# Altium PCB da12_v100.PcbDoc (part 2 of 5)
Units mil, origin at the board's own origin, x right, y up, seen from the top; angles counter-clockwise.
Board outline 4646.03 x 3622.4 mil, 4 copper layers (Top Layer, GND, POWER, Bottom Layer), stack 23.756 mil thick; 376 components, 191 nets, 1000 pads, 352 vias.
Unrouted connection lines stored in the file: 152.
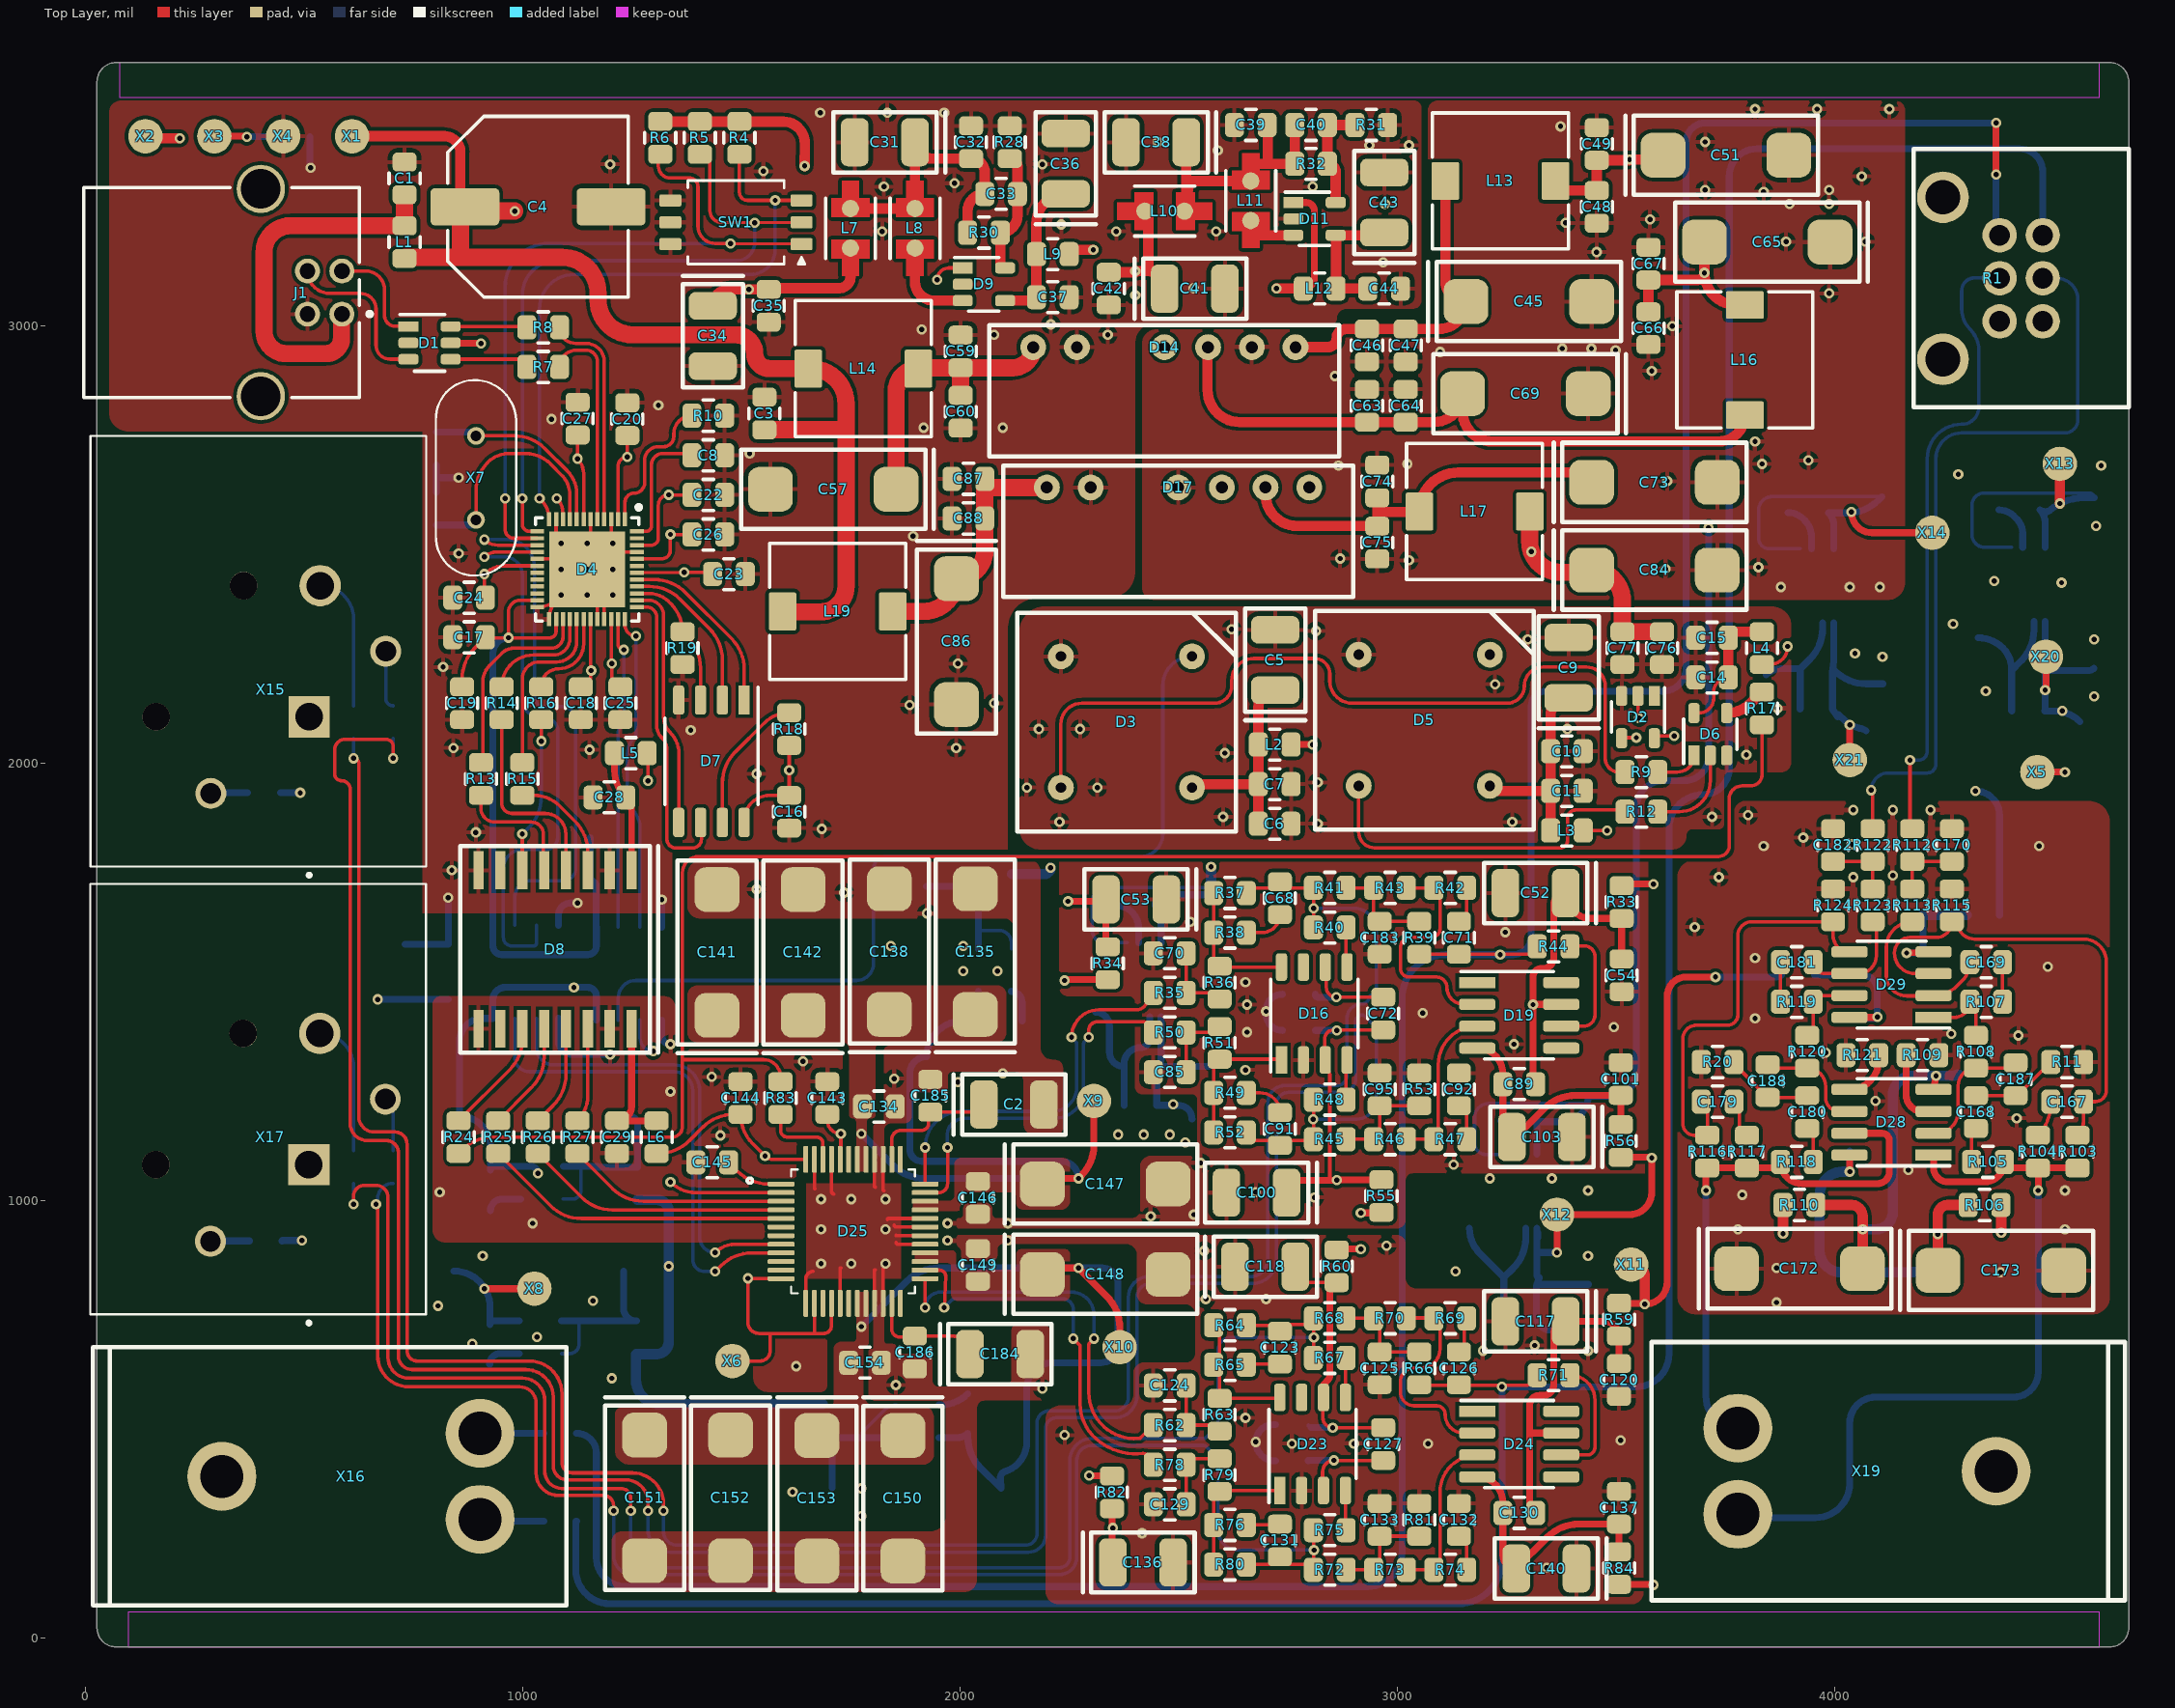
[diagram p0: Top Layer view]

## Part data (continued)
C30: "Ceramic capacitor 1206 X7R 22µF 10V", Capacitance=22uF, Case Code (Imperial)=1206, Case Code (Metric)=3216, Dielectric=X7R, Manufacturer 1=Murata, Max Operating Temperature=125°C, Min Operating Temperature=-55°C, Package Quantity=1, Tolerance=10%, Voltage=10V, Case/Package=1206, Category="Ceramic Capacitors", ComponentLink1Description=https://datasheet.ciiva.com/6072/1747483-6072695.pdf?src-supplier=Farnell, ComponentLink1URL=https://datasheet.ciiva.com/6072/1747483-6072695.pdf?src-supplier=Farnell, ComponentLink2Description=https://datasheet.ciiva.com/11787/0900766b80ef921d-11787760.pdf?src-supplier=RSComponents, ComponentLink2URL=https://datasheet.ciiva.com/11787/0900766b80ef921d-11787760.pdf?src-supplier=RSComponents, ComponentLink3Description=https://datasheet.ciiva.com/3777/1492grm31cr71a226ke1523-3777120.pdf?src-supplier=Arrow+Electronics, ComponentLink3URL=https://datasheet.ciiva.com/3777/1492grm31cr71a226ke1523-3777120.pdf?src-supplier=Arrow+Electronics, ComponentLink4Description=https://datasheet.ciiva.com/29202/451120-da-01-de-vs-chip-kond-1206-22-0-uf-10pr-10-0v-x7r-29202604.pdf?src-supplier=Conrad, ComponentLink4URL=https://datasheet.ciiva.com/29202/451120-da-01-de-vs-chip-kond-1206-22-0-uf-10pr-10-0v-x7r-29202604.pdf?src-supplier=Conrad, ComponentLink5Description=https://datasheet.ciiva.com/29202/451412-da-01-de-vs-kondens-grm31-cr71a-226ke15l-29202268.pdf?src-supplier=Conrad, ComponentLink5URL=https://datasheet.ciiva.com/29202/451412-da-01-de-vs-kondens-grm31-cr71a-226ke15l-29202268.pdf?src-supplier=Conrad, ComponentLink6Description=https://datasheet.ciiva.com/14116/grmseries-highdielectrictype-eng-14116398.pdf?src-supplier=Distrelec, ComponentLink6URL=https://datasheet.ciiva.com/14116/grmseries-highdielectrictype-eng-14116398.pdf?src-supplier=Distrelec, ComponentLink7Description=https://datasheet.ciiva.com/7937/1747483-7937735.pdf?src-supplier=Element14, ComponentLink7URL=https://datasheet.ciiva.com/7937/1747483-7937735.pdf?src-supplier=Element14, ComponentLink8Description=https://datasheet.ciiva.com/142/partnumbering-e-01-142120.pdf?src-supplier=Digi-Key, ComponentLink8URL=https://datasheet.ciiva.com/142/partnumbering-e-01-142120.pdf?src-supplier=Digi-Key, ComponentLink9Description=https://datasheet.ciiva.com/142/partnumbering-e-01-142119.pdf?src-supplier=Digi-Key, ComponentLink9URL=https://datasheet.ciiva.com/142/partnumbering-e-01-142119.pdf?src-supplier=Digi-Key, ComponentLink10Description=https://datasheet.ciiva.com/142/partnumbering-e-01-142121.pdf?src-supplier=Digi-Key, ComponentLink10URL=https://datasheet.ciiva.com/142/partnumbering-e-01-142121.pdf?src-supplier=Digi-Key, ComponentLink11Description=https://datasheet.ciiva.com/48671/product-48671339.pdf?src-supplier=Avnet, ComponentLink11URL=https://datasheet.ciiva.com/48671/product-48671339.pdf?src-supplier=Avnet, ComponentLink12Description=https://datasheet.ciiva.com/16440/product-16440671.pdf?src-supplier=Future+Electronics, ComponentLink12URL=https://datasheet.ciiva.com/16440/product-16440671.pdf?src-supplier=Future+Electronics, ComponentLink13Description=https://datasheet.ciiva.com/2989/product-2989773.pdf?src-supplier=Avnet, ComponentLink13URL=https://datasheet.ciiva.com/2989/product-2989773.pdf?src-supplier=Avnet, Construction=Flat, Depth=1.6mm, Height=1.6mm, Lead Free="Lead Free", Length=3.2mm, Manufacturer Part Number 1=GRM31CR71A226KE15L, Material=Ceramic, Mount=SMT, Packaging="Tape and Reel", Pricing 1="1=0,81930, 10=0,51230, 25=0,48340, 100=0,42480, 250=0,42420, 500=0,35180, 1000=0,34810, 3000=0,30810, 6000=0,24770, 15000=0,23430 (USD)", Radiation Hardening=No, REACH SVHC="No SVHC", RoHS=Yes, RoHS Compliant=Yes, Series=GRM, Stock 1=16303, Supplier 1="Arrow Electronics", Supplier Part Number 1=GRM31CR71A226KE15L, Termination=SMD/SMT, Thickness=0.071inch, Type=Конденсатор, Voltage Rating=10V, Voltage Rating (DC)=10V, Width=0.063inch
C33 C40: "Ceramic capacitor 0805 X7R 100pF 50V", Capacitance=1nF, Case Code (Imperial)=0805, Case Code (Metric)=2012, Dielectric=X7R, Manufacturer 2=Yageo, Manufacturer Part Number 2=CC0805MRX7R9BB102, Max Operating Temperature=125°C, Min Operating Temperature=-55°C, Resistor Type=Ceramic, Supplier Part Number 1=311-4349-1-ND, Tolerance=20%, Voltage=50V, Case/Package=0805, Category="Ceramic Capacitors", ComponentLink1Description=http://www.mouser.com/ds/2/447/Yageo_UPY-GP_NP0_16V-to-50V_9-358835.pdf?src-supplier=Mouser, ComponentLink1URL=http://www.mouser.com/ds/2/447/Yageo_UPY-GP_NP0_16V-to-50V_9-358835.pdf?src-supplier=Mouser, ComponentLink2Description=http://components.arrow.com/part/dataview/0323_04166629?src-supplier=Arrow+Europe, ComponentLink2URL=http://components.arrow.com/part/dataview/0323_04166629?src-supplier=Arrow+Europe, ComponentLink3Description=http://www.yageo.com/documents/recent/UPY-GPHC_X7R_6.3V-to-50V_18.pdf?src-supplier=Digi-Key, ComponentLink3URL=http://www.yageo.com/documents/recent/UPY-GPHC_X7R_6.3V-to-50V_18.pdf?src-supplier=Digi-Key, Depth=1.25mm, Halogen Free="Halogen Free", Lead Free="Lead Free", Length=0.079inch, Mount=SMT, Packaging="Tape and Reel", Pricing 2="1=0,14000, 10=0,08800, 50=0,08800, 100=0,03900, 1000=0,02500, 10000=0,02100 (USD)", RoHS=Yes, RoHS Compliant=Yes, Series=CC, Stock 2=5617, Supplier 1=Digi-Key, Supplier 2=Mouser, Supplier Part Number 2=603-CC805MRX7R9BB102, Thickness=0.028inch, Type=Конденсатор, Voltage Rating=50V, Voltage Rating (DC)=50V, Width=0.049inch
C45 C51 C57 C65 C69 C73 C84 C86 C135 C138 C141 C142 C147 C148 C150 C151 C152 C153 C172 C173: library part TANT_D, "Описание свойств компонента"
C145: "Ceramic capacitor 0805 X7R 1uF 50V", Capacitance=1uF, Case Code (Imperial)=0805, Case Code (Metric)=2012, Dielectric=X7R, Manufacturer 2=Yageo, Max Operating Temperature=125°C, Min Operating Temperature=-55°C, Resistor Type=Ceramic, Supplier Part Number 1=311-4349-1-ND, Tolerance=10%, Voltage=50V, Case/Package=0805, Category="Ceramic Capacitors", ComponentLink1Description=https://datasheet.ciiva.com/13209/upy-gphc-x7r-6-3v-to-50v-8-12304-13209375.pdf?src-supplier=Mouser, ComponentLink1URL=https://datasheet.ciiva.com/13209/upy-gphc-x7r-6-3v-to-50v-8-12304-13209375.pdf?src-supplier=Mouser, Construction=Flat, Depth=1.25mm, Halogen Free="Halogen Free", Height=1.25mm, Lead Free="Lead Free", Length=2mm, Manufacturer Part Number 2=CC0805KKX7R9BB105, Mount=SMT, Packaging="Tape and Reel", Pricing 2="1=0,26000, 10=0,17900, 50=0,11920, 100=0,10130, 500=0,07152, 1000=0,06257 (USD)", Radiation Hardening=No, RoHS=Yes, RoHS Compliant=Yes, Series=CC, Stock 2=48794, Supplier 1=Digi-Key, Supplier 2=Digi-Key, Supplier Part Number 2=311-1886-1-ND, Termination=SMD/SMT, Thickness=0.057inch, Type=Конденсатор, Voltage Rating=50V, Voltage Rating (DC)=50V, Weight=0.000194oz, Width=0.049inch
D1: "Very low capacitance ESD protection", Case/Package=SOT-23-6, Supplier Part Number 1=7131158, Mount=SMT, Supplier 1="Future Electronics", Type=Микросхема
D2: "Single Schmitt-Trigger Inverter", Case/Package=SOT-23-5, Supplier Part Number 1=296-11607-1-ND, Mount=SMT, Supplier 1=Digi-Key, Type=Микросхема
D3 D5: library part OSC_4PIN_DIL, "Описание свойств компонента"
D4: library part CT7601, "Описание свойств компонента"
D6: library part 1G32, "Описание свойств компонента"
D7: "3V 32M-BIT SERIAL FLASH MEMORY WITH DUAL, QUAD SPI", Case/Package=SOIC-8-208, Supplier Part Number 1=W25Q32JVSSIQCT-ND, Mount=SMT, Supplier 1=Digi-Key, Supplier 2=Digi-Key, Supplier 3=RSComponents, Supplier 4="Arrow Electronics", Supplier 5=RSComponents, Supplier Part Number 2=W25Q32JVSSIQ-ND, Supplier Part Number 3=1882528, Supplier Part Number 4="W25Q32JVSSIM TR", Supplier Part Number 5=1712228, Type=Микросхема
D8: library part ADUM140X, "Описание свойств компонента"
D9 D11: library part SY8088, "Описание свойств компонента"
D10 D12: library part ADUM1250, "Описание свойств компонента"
D13 D15 D18 D21: library part LP2985, "Описание свойств компонента"
D14: library part AM3D-0509DH30Z, "Описание свойств компонента"
D16 D23: library part OPA1632_SOIC, "Описание свойств компонента"
D17: library part AM3D-0509SZ, "Описание свойств компонента"
D19 D24: library part TL061, "Описание свойств компонента"
D20 D22 D26 D27: library part TPS7A4901/3001, "Описание свойств компонента"
D25: library part AK4490_TQFP, "Описание свойств компонента"
D28 D29: "Dual standard, industrial-grade, operational amplifier 8-SOIC -25 to 85", Case/Package=SOIC-8-150, Dual Supply Voltage=9V, Input Bias Current=200pA, Input Offset Voltage (Vos)=3mV, Manufacturer 1="Texas Instruments", Manufacturer Part Number 2=TL062ID, Max Dual Supply Voltage=18V, Max I/O Voltage=6mV, Max Operating Temperature=85°C, Max Supply Current=500uA, Min Dual Supply Voltage=3.5V, Min Operating Temperature=-40°C, Min Supply Voltage=3V, Operating Supply Current=200uA, Output Current=30mA, Package Quantity=50, Supplier Part Number 1=595-LM258DR, Supply Current=1.2mA, Voltage Gain=75.56dB, Amplifier Type="GENERAL PURPOSE", Bandwidth=1MHz, Category="Amplifiers - Op Amps, Buffer, Instrumentation", Common Mode Rejection Ratio=80dB, ComponentLink1Description=https://datasheet.ciiva.com/27051/1063193-27051334.pdf?src-supplier=Jameco, ComponentLink1URL=https://datasheet.ciiva.com/27051/1063193-27051334.pdf?src-supplier=Jameco, ComponentLink2Description=https://datasheet.ciiva.com/7738/1768032-7738657.pdf?src-supplier=Element14, ComponentLink2URL=https://datasheet.ciiva.com/7738/1768032-7738657.pdf?src-supplier=Element14, ComponentLink3Description=https://datasheet.ciiva.com/14151/tl06x-series-eng-tds-14151159.pdf?src-supplier=Distrelec, ComponentLink3URL=https://datasheet.ciiva.com/14151/tl06x-series-eng-tds-14151159.pdf?src-supplier=Distrelec, ComponentLink4Description=https://datasheet.ciiva.com/1797/tl062a-1797198.pdf?src-supplier=Digi-Key, ComponentLink4URL=https://datasheet.ciiva.com/1797/tl062a-1797198.pdf?src-supplier=Digi-Key, ComponentLink5Description=https://datasheet.ciiva.com/15129/getdatasheetpartid-40375-15129693.pdf?src-supplier=Verical, ComponentLink5URL=https://datasheet.ciiva.com/15129/getdatasheetpartid-40375-15129693.pdf?src-supplier=Verical, ComponentLink6Description=https://datasheet.ciiva.com/1797/tl062a-1797276.pdf?src-supplier=Digi-Key, ComponentLink6URL=https://datasheet.ciiva.com/1797/tl062a-1797276.pdf?src-supplier=Digi-Key, ComponentLink7Description=https://datasheet.ciiva.com/7738/1634178-7738543.pdf?src-supplier=Element14, ComponentLink7URL=https://datasheet.ciiva.com/7738/1634178-7738543.pdf?src-supplier=Element14, ComponentLink8Description=https://datasheet.ciiva.com/2974/tl062-2974181.pdf?src-supplier=Avnet, ComponentLink8URL=https://datasheet.ciiva.com/2974/tl062-2974181.pdf?src-supplier=Avnet, ComponentLink9Description=https://datasheet.ciiva.com/48712/001011491-da-01-en-ic-opamp-jfet-1mhz-du-tl062id-soic-8-tid-48712330.pdf?src-supplier=Conrad, ComponentLink9URL=https://datasheet.ciiva.com/48712/001011491-da-01-en-ic-opamp-jfet-1mhz-du-tl062id-soic-8-tid-48712330.pdf?src-supplier=Conrad, ComponentLink10Description=https://datasheet.ciiva.com/34302/1342934-34302235.pdf?src-supplier=Jameco, ComponentLink10URL=https://datasheet.ciiva.com/34302/1342934-34302235.pdf?src-supplier=Jameco, ComponentLink11Description=https://datasheet.ciiva.com/1795/lm258a-1795505.pdf?src-supplier=Digi-Key, ComponentLink11URL=https://datasheet.ciiva.com/1795/lm258a-1795505.pdf?src-supplier=Digi-Key, ComponentLink12Description=https://datasheet.ciiva.com/1795/lm258a-1795506.pdf?src-supplier=Digi-Key, ComponentLink12URL=https://datasheet.ciiva.com/1795/lm258a-1795506.pdf?src-supplier=Digi-Key, ComponentLink13Description=https://datasheet.ciiva.com/1795/lm258a-1795507.pdf?src-supplier=Digi-Key, ComponentLink13URL=https://datasheet.ciiva.com/1795/lm258a-1795507.pdf?src-supplier=Digi-Key, ComponentLink14Description=https://datasheet.ciiva.com/2973/lm358a-2973285.pdf?src-supplier=Avnet, ComponentLink14URL=https://datasheet.ciiva.com/2973/lm358a-2973285.pdf?src-supplier=Avnet, ComponentLink15Description=https://datasheet.ciiva.com/26223/lm358a-26223035.pdf?src-supplier=Avnet+Europe, ComponentLink15URL=https://datasheet.ciiva.com/26223/lm358a-26223035.pdf?src-supplier=Avnet+Europe, ComponentLink16Description=https://datasheet.ciiva.com/16464/lm358a-16464604.pdf?src-supplier=Avnet+Asia, ComponentLink16URL=https://datasheet.ciiva.com/16464/lm358a-16464604.pdf?src-supplier=Avnet+Asia, ComponentLink17Description=https://datasheet.ciiva.com/48711/001071481-da-01-en-ic-opamp-gp-700khz-du-lm258dr-soic-8-tid-48711227.pdf?src-supplier=Conrad, ComponentLink17URL=https://datasheet.ciiva.com/48711/001071481-da-01-en-ic-opamp-gp-700khz-du-lm258dr-soic-8-tid-48711227.pdf?src-supplier=Conrad, Contact Plating=Gold, Gain Bandwidth Product=1MHz, Height=4.57mm, Lead Free="Lead Free", Length=9.81mm, Manufacturer 2="Texas Instruments", Manufacturer Part Number 1=LM258DR, Max Supply Voltage=18V, Mount=SMT, Nominal Gain Bandwidth Product=1MHz, Nominal Supply Current=500uA, Number of Amplifiers=2, Number of Channels=2, Number of Circuits=2, Number of Elements=2, Number of Pins=8, Operating Supply Voltage=18V, Output Current per Channel=30mA, Packaging=Rail/Tube, Pricing 1="2500=0,11900 (USD)", Pricing 2="1=1,40000, 10=1,25400, 25=1,19000, 100=0,97760, 250=0,91388, 500=0,80762, 1000=0,70175 (USD)", Radiation Hardening=No, REACH SVHC="No SVHC", RoHS=Yes, RoHS Compliant=Yes, Series=-, Slew Rate=3.5V/µs, Stock 1=59536, Stock 2=9100, Supplier 1=Mouser, Technology=BIPOLAR, Type=Микросхема, Unity Gain Bandwidth Product=1MHz, Width=6.35mm
J1: library part CMP-002-00041-1, "USB Receptacle B Type, Right Angle, 4 Position, Height 11.5 mm,-40 to 85 degC, RoHS, Tube", Colour=Black, Current Rating=1.5A, Manufacturer="FCI Electronics", Max Operating Temperature=40°C, Min Operating Temperature=0°C, Package Description="4-Pin Through Hole Device, Body 16 x 12.2 mm", Package Quantity=44, Case/Package=61729-1011BLF, Connector Type=USB, Contact Material=Copper, Contact Plating=Nickel, Datasheet URL=http://portal.fciconnect.com/Comergent/fci/drawing/61729.pdf, Datasheet Version="Rev. W, 05/2014", Gender=Female, Lead Pitch=2.5mm, Manufacturer URL=http://portal.fciconnect.com/, Mounting Technology=TH, Package Reference=61729-1011BLF, Packaging=Rail/Tube, Pins=4, RoHS Compliant=True
L1 L2 L3 L4 L5 L6 L9 L12 L15 L18 L20 L21: library part SMD_BLM0805, "Описание свойств компонента"
L7 L8 L10 L11: library part LQH32MN220J23L, "Chip Coils for DC-DC Converter Wire Wound Type LQH32MN_23 Series 1210 (3225) 220 uH, 150 mA", Case/Package=SMD-2, Supplier Part Number 1=490-4048-1-ND, Mount=SMT, Supplier 1=Digi-Key, Type="Катушка индуктивности"
L13 L14 L16 L17 L19: "Shielded Inductors 470 uH, 260 mA, 3.01 Ohm", Case/Package=SMD-2, Supplier Part Number 1=CDRH74NP-471MC-B, Mount=SMT, Supplier 1=Avnet, Type="Катушка индуктивности"
R1: library part ALPS_RK09L, "Описание свойств компонента"
R2 R3 R4 R5 R6 R28 R30 R31 R32: "Chip Resistor Surface Mount 0805 10 кОм", Case Code (Imperial)=0805, Case Code (Metric)=2012, Manufacturer 1=Yageo, Max Operating Temperature=155°C, Max Power Dissipation=125mW, Min Operating Temperature=-55°C, Resistance=10kR, Resistance Tolerance=5%, Resistor Type="Thick Film", Supplier Part Number 1=1995759, Temperature Coefficient=100ppm/°C, Voltage Rating=150V, Case/Package=0805, Category="Chip SMD Resistors", ComponentLink1Description=https://datasheet.ciiva.com/7983/444164-7983765.pdf?src-supplier=Element14, ComponentLink1URL=https://datasheet.ciiva.com/7983/444164-7983765.pdf?src-supplier=Element14, ComponentLink2Description=https://datasheet.ciiva.com/7941/444164-7941870.pdf?src-supplier=Element14, ComponentLink2URL=https://datasheet.ciiva.com/7941/444164-7941870.pdf?src-supplier=Element14, ComponentLink3Description=https://datasheet.ciiva.com/7941/444164-7941871.pdf?src-supplier=Element14, ComponentLink3URL=https://datasheet.ciiva.com/7941/444164-7941871.pdf?src-supplier=Element14, Construction=Rectangular, Contact Plating=Tin,Matte, Depth=1.25mm, Features="Moisture Resistant", Height=0.5mm, Lead Free="Lead Free", Length=2mm, Manufacturer Part Number 1=RC0805JR-0710KL, Military Standard=Not, Mount=SMT, Number of Terminations=2, Packaging="Tape and Reel", Power Rating=125mW, Pricing 1="5000=0,00300 (GBP)", Radiation Hardening=No, REACH SVHC=Unknown, RoHS=Yes, RoHS Compliant=Yes, Series=RC, Size Code=0805, Stock 1=30000, Supplier 1=RSComponents, Termination=SMD/SMT, Tolerance=5%, Type=Резистор, Width=1.25mm
R7 R8: "Chip Resistor Surface Mount 0805 24 Ом", Case Code (Imperial)=0805, Case Code (Metric)=2012, Manufacturer 1=Yageo, Max Operating Temperature=155°C, Max Power Dissipation=125mW, Min Operating Temperature=-55°C, Package Quantity=1, Resistance=24R, Resistor Type="Thick Film", Temperature Coefficient=100ppm/°C, Tolerance=5%, Voltage Rating=150V, Case/Package=0805, Category="Chip SMD Resistors", ComponentLink1Description=https://datasheet.ciiva.com/2456/pyu-r-int-thick-7-2456171.pdf?src-supplier=Digi-Key, ComponentLink1URL=https://datasheet.ciiva.com/2456/pyu-r-int-thick-7-2456171.pdf?src-supplier=Digi-Key, ComponentLink2Description=https://datasheet.ciiva.com/2456/pyu-r-int-thick-7-2456172.pdf?src-supplier=Digi-Key, ComponentLink2URL=https://datasheet.ciiva.com/2456/pyu-r-int-thick-7-2456172.pdf?src-supplier=Digi-Key, ComponentLink3Description=https://datasheet.ciiva.com/2456/pyu-r-int-thick-7-2456170.pdf?src-supplier=Digi-Key, ComponentLink3URL=https://datasheet.ciiva.com/2456/pyu-r-int-thick-7-2456170.pdf?src-supplier=Digi-Key, ComponentLink4Description=https://datasheet.ciiva.com/16776/rc0805-16776854.pdf?src-supplier=Future+Electronics, ComponentLink4URL=https://datasheet.ciiva.com/16776/rc0805-16776854.pdf?src-supplier=Future+Electronics, Construction=Rectangular, Contact Plating=Tin,Matte,Lead, Depth=1.25mm, Features="Moisture Resistant", Height=0.024inch, Lead Free="Lead Free", Length=2mm, Manufacturer Part Number 1=RC0805JR-0724RL, Military Standard=Not, Mount=SMT, Number of Terminations=2, Packaging="Tape and Reel", Power Rating=125mW, Pricing 1="1=0,06100, 10=0,03050, 25=0,03020, 100=0,01240, 250=0,01230 (USD)", Radiation Hardening=No, RoHS=Yes, RoHS Compliant=Yes, Series=RC, Size Code=0805, Stock 1=375, Supplier 1="Arrow Electronics", Supplier Part Number 1=RC0805JR-0724RL, Termination=SMD/SMT, Type=Резистор, Voltage Rating (DC)=150V, Width=0.049inch
R9 R12 R13 R14 R15 R16 R17 R24 R25 R26 R27 R33 R34 R40 R44 R48 R55 R56 R59 R60 R67 R71 R75 R82 R84: "Chip Resistor Surface Mount 0805 10 Ом", Case Code (Imperial)=0805, Case Code (Metric)=2012, Manufacturer 1=Yageo, Max Operating Temperature=155°C, Max Power Dissipation=125mW, Min Operating Temperature=-55°C, Package Quantity=1, Resistance=10R, Resistance Tolerance=5%, Resistor Type="Thick Film", Temperature Coefficient=200ppm/°C, Voltage Rating=150V, Case/Package=0805, Category="Chip SMD Resistors", ComponentLink1Description=https://datasheet.ciiva.com/46395/444164-46395129.pdf?src-supplier=Element14, ComponentLink1URL=https://datasheet.ciiva.com/46395/444164-46395129.pdf?src-supplier=Element14, ComponentLink2Description=https://datasheet.ciiva.com/2456/pyu-r-int-thick-7-2456041.pdf?src-supplier=Digi-Key, ComponentLink2URL=https://datasheet.ciiva.com/2456/pyu-r-int-thick-7-2456041.pdf?src-supplier=Digi-Key, ComponentLink3Description=https://datasheet.ciiva.com/2456/pyu-r-int-thick-7-2456042.pdf?src-supplier=Digi-Key, ComponentLink3URL=https://datasheet.ciiva.com/2456/pyu-r-int-thick-7-2456042.pdf?src-supplier=Digi-Key, ComponentLink4Description=https://datasheet.ciiva.com/2456/pyu-r-int-thick-7-2456040.pdf?src-supplier=Digi-Key, ComponentLink4URL=https://datasheet.ciiva.com/2456/pyu-r-int-thick-7-2456040.pdf?src-supplier=Digi-Key, ComponentLink5Description=https://datasheet.ciiva.com/12667/rc0805-12667031.pdf?src-supplier=Mouser, ComponentLink5URL=https://datasheet.ciiva.com/12667/rc0805-12667031.pdf?src-supplier=Mouser, Contact Plating=Tin,Matte,Lead, Features="Moisture Resistant", Height=0.024inch, Lead Free="Lead Free", Length=0.079inch, Manufacturer Part Number 1=RC0805JR-0710RL, Mount=SMT, Number of Terminations=2, Packaging="Tape and Reel", Power Rating=125mW, Pricing 1="1=0,07580, 10=0,05800, 25=0,05130 (USD)", Radiation Hardening=No, REACH SVHC=Unknown, RoHS=Yes, RoHS Compliant=Yes, Series=RC, Size Code=0805, Stock 1=27, Supplier 1="Arrow Electronics", Supplier Part Number 1=RC0805JR-0710RL, Termination=SMD/SMT, Tolerance=5%, Type=Резистор, Width=0.049inch
R10: "Chip Resistor Surface Mount 0805 18 Ом", Case Code (Imperial)=0805, Case Code (Metric)=2012, Manufacturer 1=Yageo, Max Operating Temperature=155°C, Max Power Dissipation=125mW, Min Operating Temperature=-55°C, Package Quantity=1, Resistance=18R, Resistance Tolerance=5%, Resistor Type="Thick Film", Temperature Coefficient=100ppm/°C, Voltage Rating=150V, Case/Package=0805, Category="Chip SMD Resistors", ComponentLink1Description=https://datasheet.ciiva.com/2508/pyu-r-int-thick-7-2508730.pdf?src-supplier=Digi-Key, ComponentLink1URL=https://datasheet.ciiva.com/2508/pyu-r-int-thick-7-2508730.pdf?src-supplier=Digi-Key, ComponentLink2Description=https://datasheet.ciiva.com/2508/pyu-r-int-thick-7-2508731.pdf?src-supplier=Digi-Key, ComponentLink2URL=https://datasheet.ciiva.com/2508/pyu-r-int-thick-7-2508731.pdf?src-supplier=Digi-Key, ComponentLink3Description=https://datasheet.ciiva.com/2508/pyu-r-int-thick-7-2508729.pdf?src-supplier=Digi-Key, ComponentLink3URL=https://datasheet.ciiva.com/2508/pyu-r-int-thick-7-2508729.pdf?src-supplier=Digi-Key, ComponentLink4Description=https://datasheet.ciiva.com/12558/rc0805-257173-12558905.pdf?src-supplier=Mouser, ComponentLink4URL=https://datasheet.ciiva.com/12558/rc0805-257173-12558905.pdf?src-supplier=Mouser, ComponentLink5Description=https://datasheet.ciiva.com/7941/442941-7941903.pdf?src-supplier=Element14, ComponentLink5URL=https://datasheet.ciiva.com/7941/442941-7941903.pdf?src-supplier=Element14, ComponentLink6Description=https://datasheet.ciiva.com/17043/rc0805-17043703.pdf?src-supplier=Future+Electronics, ComponentLink6URL=https://datasheet.ciiva.com/17043/rc0805-17043703.pdf?src-supplier=Future+Electronics, Construction=Rectangular, Contact Plating=Tin,Matte,Lead, Depth=1.25mm, Features="Moisture Resistant", Height=0.024inch, Lead Free="Lead Free", Length=2mm, Manufacturer Part Number 1=RC0805JR-0718RL, Military Standard=Not, Mount=SMT, Number of Terminations=2, Packaging="Tape and Reel", Power Rating=125mW, Pricing 1="1=0,03540, 10=0,01050, 25=0,01040, 100=0,00430, 250=0,00420, 1000=0,00230, 3000=0,00210, 6000=0,00180 (USD)", Radiation Hardening=No, REACH SVHC=Unknown, RoHS=Yes, RoHS Compliant=Yes, Series=RC, Size Code=0805, Stock 1=12330, Supplier 1="Arrow Electronics", Supplier Part Number 1=RC0805JR-0718RL, Termination=SMD/SMT, Tolerance=5%, Type=Резистор, Width=0.049inch
R11 R20 R54 R57 R58 R61 R98 R99 R101 R102 R103 R104 R105 R106 R107 R108 R109 R110 R111 R112 R113 R114 R115 R116 R117 R118 R119 R120 R121 R122 R123 R124: "Chip Resistor Surface Mount 0805 1 кОм", Case Code (Imperial)=0805, Case Code (Metric)=2012, Manufacturer 1=Yageo, Max Operating Temperature=155°C, Max Power Dissipation=125mW, Min Operating Temperature=-55°C, Resistance=1kR, Resistance Tolerance=5%, Resistor Type="Thick Film", Supplier Part Number 1=1995761, Temperature Coefficient=100ppm/°C, Voltage Rating=150V, Case/Package=0805, Category="Chip SMD Resistors", ComponentLink1Description=https://datasheet.ciiva.com/46395/444164-46395131.pdf?src-supplier=Element14, ComponentLink1URL=https://datasheet.ciiva.com/46395/444164-46395131.pdf?src-supplier=Element14, ComponentLink2Description=https://datasheet.ciiva.com/12667/rc0805-12667110.pdf?src-supplier=Mouser, ComponentLink2URL=https://datasheet.ciiva.com/12667/rc0805-12667110.pdf?src-supplier=Mouser, ComponentLink3Description=https://datasheet.ciiva.com/7941/442941-7941911.pdf?src-supplier=Element14, ComponentLink3URL=https://datasheet.ciiva.com/7941/442941-7941911.pdf?src-supplier=Element14, ComponentLink4Description=https://datasheet.ciiva.com/7941/442941-7941912.pdf?src-supplier=Element14, ComponentLink4URL=https://datasheet.ciiva.com/7941/442941-7941912.pdf?src-supplier=Element14, ComponentLink5Description=https://datasheet.ciiva.com/15190/getdatasheetpartid-135056-15190037.pdf?src-supplier=Verical, ComponentLink5URL=https://datasheet.ciiva.com/15190/getdatasheetpartid-135056-15190037.pdf?src-supplier=Verical, Construction=Rectangular, Contact Plating=Tin,Lead,Matte, Depth=1.25mm, Features="Moisture Resistant", Lead Free="Lead Free", Length=2mm, Manufacturer Part Number 1=RC0805JR-071KL, Military Standard=Not, Mount=SMT, Number of Terminations=2, Packaging="Tape and Reel", Power Rating=125mW, Pricing 1="5000=0,00300 (GBP)", Radiation Hardening=No, REACH SVHC=Unknown, RoHS=Yes, RoHS Compliant=Yes, Series=RC, Size Code=0805, Stock 1=22200, Supplier 1=RSComponents, Termination=SMD/SMT, Tolerance=5%, Type=Резистор
R18 R19: "Chip Resistor Surface Mount 0805 100 кОм", Case Code (Imperial)=0805, Case Code (Metric)=2012, Manufacturer 1=Yageo, Max Operating Temperature=155°C, Max Power Dissipation=125mW, Min Operating Temperature=-55°C, Resistance=100kR, Resistance Tolerance=5%, Resistor Type="Thick Film", Temperature Coefficient=100ppm/°C, Voltage Rating=150V, Case/Package=0805, Category="Chip SMD Resistors", ComponentLink1Description=https://datasheet.ciiva.com/7941/442941-7941865.pdf?src-supplier=Element14, ComponentLink1URL=https://datasheet.ciiva.com/7941/442941-7941865.pdf?src-supplier=Element14, ComponentLink2Description=https://datasheet.ciiva.com/7941/442941-7941864.pdf?src-supplier=Element14, ComponentLink2URL=https://datasheet.ciiva.com/7941/442941-7941864.pdf?src-supplier=Element14, ComponentLink3Description=https://datasheet.ciiva.com/15190/getdatasheetpartid-479267-15190029.pdf?src-supplier=Verical, ComponentLink3URL=https://datasheet.ciiva.com/15190/getdatasheetpartid-479267-15190029.pdf?src-supplier=Verical, Construction=Rectangular, Contact Plating=Tin,Matte,Lead, Depth=1.25mm, Features="Moisture Resistant", Lead Free="Lead Free", Length=2mm, Manufacturer Part Number 1=RC0805JR-07100KL, Military Standard=Not, Mount=SMT, Number of Terminations=2, Packaging="Tape and Reel", Power Rating=125mW, Pricing 1="1=0,05570, 10=0,03050 (USD)", Radiation Hardening=No, REACH SVHC=Unknown, RoHS=Yes, RoHS Compliant=Yes, Series=RC, Size Code=0805, Stock 1=22, Supplier 1="Arrow Electronics", Supplier Part Number 1=RC0805JR-07100KL, Termination=SMD/SMT, Tolerance=5%, Type=Резистор
R29: "Chip Resistor Surface Mount 1206 200 кОм", Case Code (Imperial)=1206, Case Code (Metric)=3216, Manufacturer 1=Yageo, Max Operating Temperature=155°C, Max Power Dissipation=250mW, Min Operating Temperature=-55°C, Package Quantity=1, Resistance=200kR, Resistor Type="Thick Film", Temperature Coefficient=100ppm/°C, Tolerance=5%, Voltage Rating (DC)=400V, Case/Package=1206, Category="Chip SMD Resistors", ComponentLink1Description=https://datasheet.ciiva.com/2520/pyu-r-int-thick-7-2520645.pdf?src-supplier=Digi-Key, ComponentLink1URL=https://datasheet.ciiva.com/2520/pyu-r-int-thick-7-2520645.pdf?src-supplier=Digi-Key, ComponentLink2Description=https://datasheet.ciiva.com/2520/pyu-r-int-thick-7-2520646.pdf?src-supplier=Digi-Key, ComponentLink2URL=https://datasheet.ciiva.com/2520/pyu-r-int-thick-7-2520646.pdf?src-supplier=Digi-Key, ComponentLink3Description=https://datasheet.ciiva.com/16746/pyu-rc1206-51-rohs-l-4-16746043.pdf?src-supplier=Future+Electronics, ComponentLink3URL=https://datasheet.ciiva.com/16746/pyu-rc1206-51-rohs-l-4-16746043.pdf?src-supplier=Future+Electronics, Construction=Rectangular, Depth=1.6mm, Features="Moisture Resistant", Height=0.026inch, Lead Free="Lead Free", Length=0.122inch, Manufacturer Part Number 1=RC1206JR-07200KL, Military Standard=Not, Mount=SMT, Number of Terminations=2, Packaging="Tape and Reel", Power Rating=250mW, Pricing 1="5000=0,00440 (USD)", RoHS 1=Yes, RoHS Compliant=Yes, Series=RC, Size Code=1206, Stock 1=45000, Supplier 1="Arrow Electronics", Supplier Part Number 1=RC1206JR-07200KL, Type=Резистор, Width=0.063inch
R35 R36 R37 R38 R39 R41 R42 R43 R45 R46 R47 R49 R50 R51 R52 R53 R62 R63 R64 R65 R66 R68 R69 R70 R72 R73 R74 R76 R78 R79 R80 R81: "Chip Resistor Surface Mount 0805 2,2 кОм", Case Code (Imperial)=0805, Case Code (Metric)=2012, Manufacturer 1=Yageo, Max Operating Temperature=155°C, Max Power Dissipation=125mW, Min Operating Temperature=-55°C, Resistance=2.2kR, Resistance Tolerance=5%, Resistor Type="Thick Film", Temperature Coefficient=100ppm/°C, Voltage Rating=150V, Case/Package=0805, Category="Chip SMD Resistors", ComponentLink1Description=https://datasheet.ciiva.com/12667/rc0805-12667397.pdf?src-supplier=Mouser, ComponentLink1URL=https://datasheet.ciiva.com/12667/rc0805-12667397.pdf?src-supplier=Mouser, ComponentLink2Description=https://datasheet.ciiva.com/7941/442941-7941935.pdf?src-supplier=Element14, ComponentLink2URL=https://datasheet.ciiva.com/7941/442941-7941935.pdf?src-supplier=Element14, ComponentLink3Description=https://datasheet.ciiva.com/15190/getdatasheetpartid-251869-15190044.pdf?src-supplier=Verical, ComponentLink3URL=https://datasheet.ciiva.com/15190/getdatasheetpartid-251869-15190044.pdf?src-supplier=Verical, Construction=Rectangular, Contact Plating=Tin,Lead,Matte, Depth=1.25mm, Features="Moisture Resistant", Lead Free="Lead Free", Length=2mm, Manufacturer Part Number 1=RC0805JR-072K2L, Military Standard=Not, Mount=SMT, Number of Terminations=2, Packaging="Tape and Reel", Power Rating=125mW, Pricing 1="5000=0,00590, 10000=0,00350 (USD)", Radiation Hardening=No, REACH SVHC=Unknown, RoHS=Yes, RoHS Compliant=Yes, Series=RC, Size Code=0805, Stock 1=135000, Supplier 1="Arrow Electronics", Supplier Part Number 1=RC0805JR-072K2L, Termination=SMD/SMT, Tolerance=5%, Type=Резистор
R77 R83 R97: "Chip Resistor Surface Mount 0805 47 Ом", Case Code (Imperial)=0805, Case Code (Metric)=2012, Manufacturer 1=Yageo, Manufacturer Part Number 1=RC0805JR-0718RL, Max Operating Temperature=155°C, Max Power Dissipation=125mW, Min Operating Temperature=-55°C, Package Quantity=1, Resistance=47R, Resistance Tolerance=5%, Resistor Type="Thick Film", Supplier Part Number 1=1799501, Temperature Coefficient=100ppm/°C, Voltage Rating=150V, Case/Package=0805, Category="Chip SMD Resistors", ComponentLink1Description=https://datasheet.ciiva.com/2508/pyu-r-int-thick-7-2508730.pdf?src-supplier=Digi-Key, ComponentLink1URL=https://datasheet.ciiva.com/2508/pyu-r-int-thick-7-2508730.pdf?src-supplier=Digi-Key, ComponentLink2Description=https://datasheet.ciiva.com/2508/pyu-r-int-thick-7-2508731.pdf?src-supplier=Digi-Key, ComponentLink2URL=https://datasheet.ciiva.com/2508/pyu-r-int-thick-7-2508731.pdf?src-supplier=Digi-Key, ComponentLink3Description=https://datasheet.ciiva.com/2508/pyu-r-int-thick-7-2508729.pdf?src-supplier=Digi-Key, ComponentLink3URL=https://datasheet.ciiva.com/2508/pyu-r-int-thick-7-2508729.pdf?src-supplier=Digi-Key, ComponentLink4Description=https://datasheet.ciiva.com/12558/rc0805-257173-12558905.pdf?src-supplier=Mouser, ComponentLink4URL=https://datasheet.ciiva.com/12558/rc0805-257173-12558905.pdf?src-supplier=Mouser, ComponentLink5Description=https://datasheet.ciiva.com/7941/442941-7941903.pdf?src-supplier=Element14, ComponentLink5URL=https://datasheet.ciiva.com/7941/442941-7941903.pdf?src-supplier=Element14, ComponentLink6Description=https://datasheet.ciiva.com/17043/rc0805-17043703.pdf?src-supplier=Future+Electronics, ComponentLink6URL=https://datasheet.ciiva.com/17043/rc0805-17043703.pdf?src-supplier=Future+Electronics, Construction=Rectangular, Contact Plating=Tin,Matte,Lead, Depth=1.25mm, Features="Moisture Resistant", Height=0.024inch, Lead Free="Lead Free", Length=2mm, Military Standard=Not, Mount=SMT, Number of Terminations=2, Packaging="Tape and Reel", Power Rating=125mW, Pricing 1="1=0,03540, 10=0,01050, 25=0,01040, 100=0,00430, 250=0,00420, 1000=0,00230, 3000=0,00210, 6000=0,00180 (USD)", Radiation Hardening=No, REACH SVHC=Unknown, RoHS=Yes, RoHS Compliant=Yes, Series=RC, Size Code=0805, Stock 1=12330, Supplier 1=Farnell, Termination=SMD/SMT, Tolerance=5%, Type=Резистор, Width=0.049inch